# EAGLE board ecad-transmitter-v4-transmitter-v4-brd (EAGLE 9.7.0)
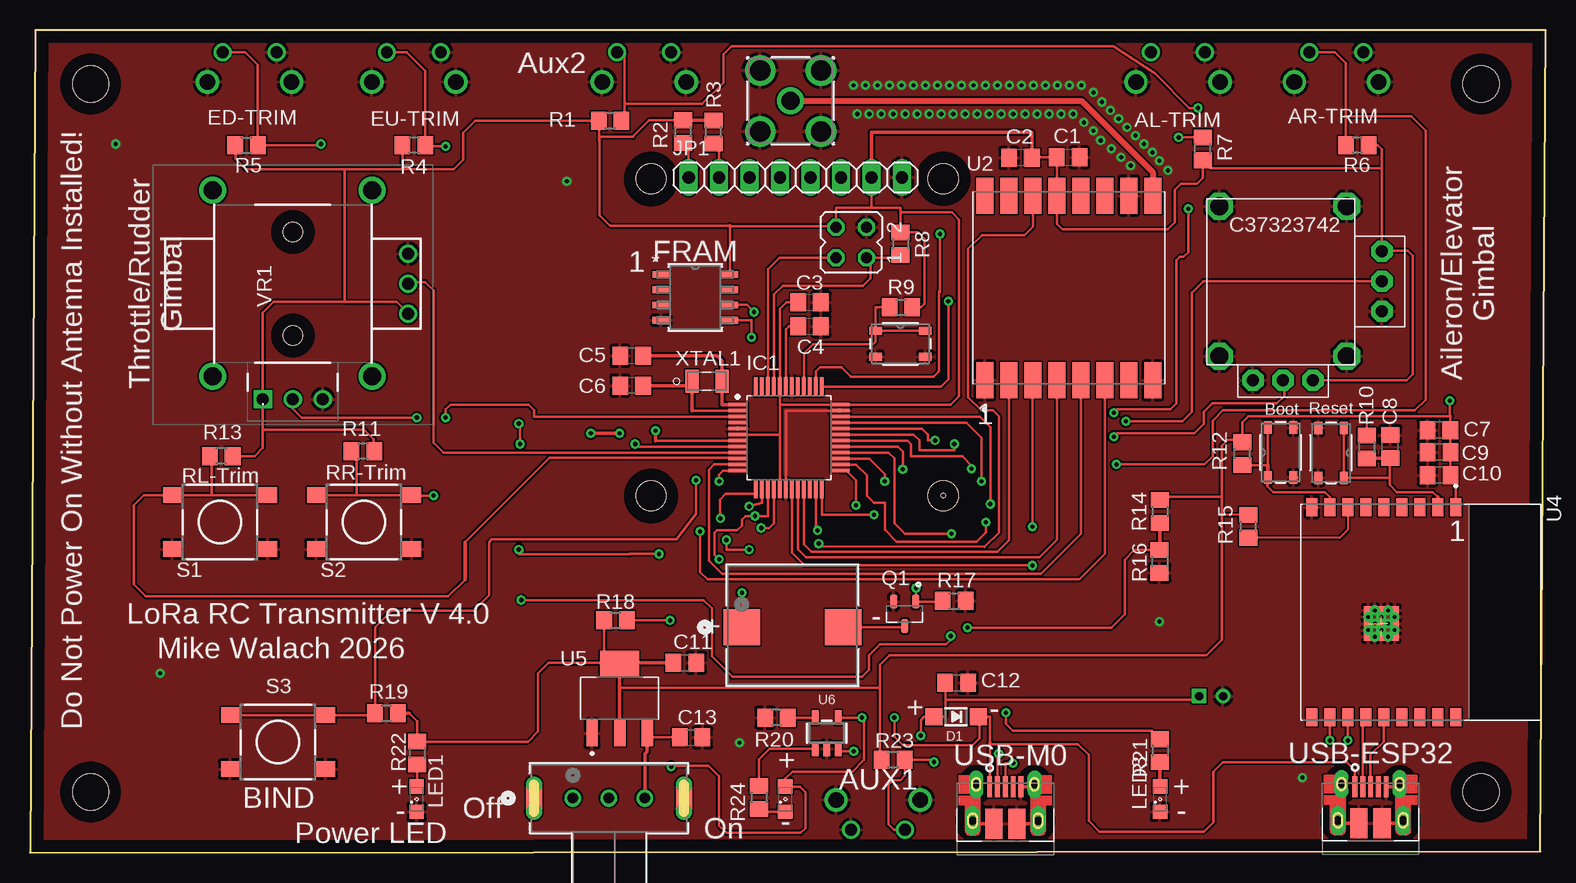
[diagram p0: board, top side]
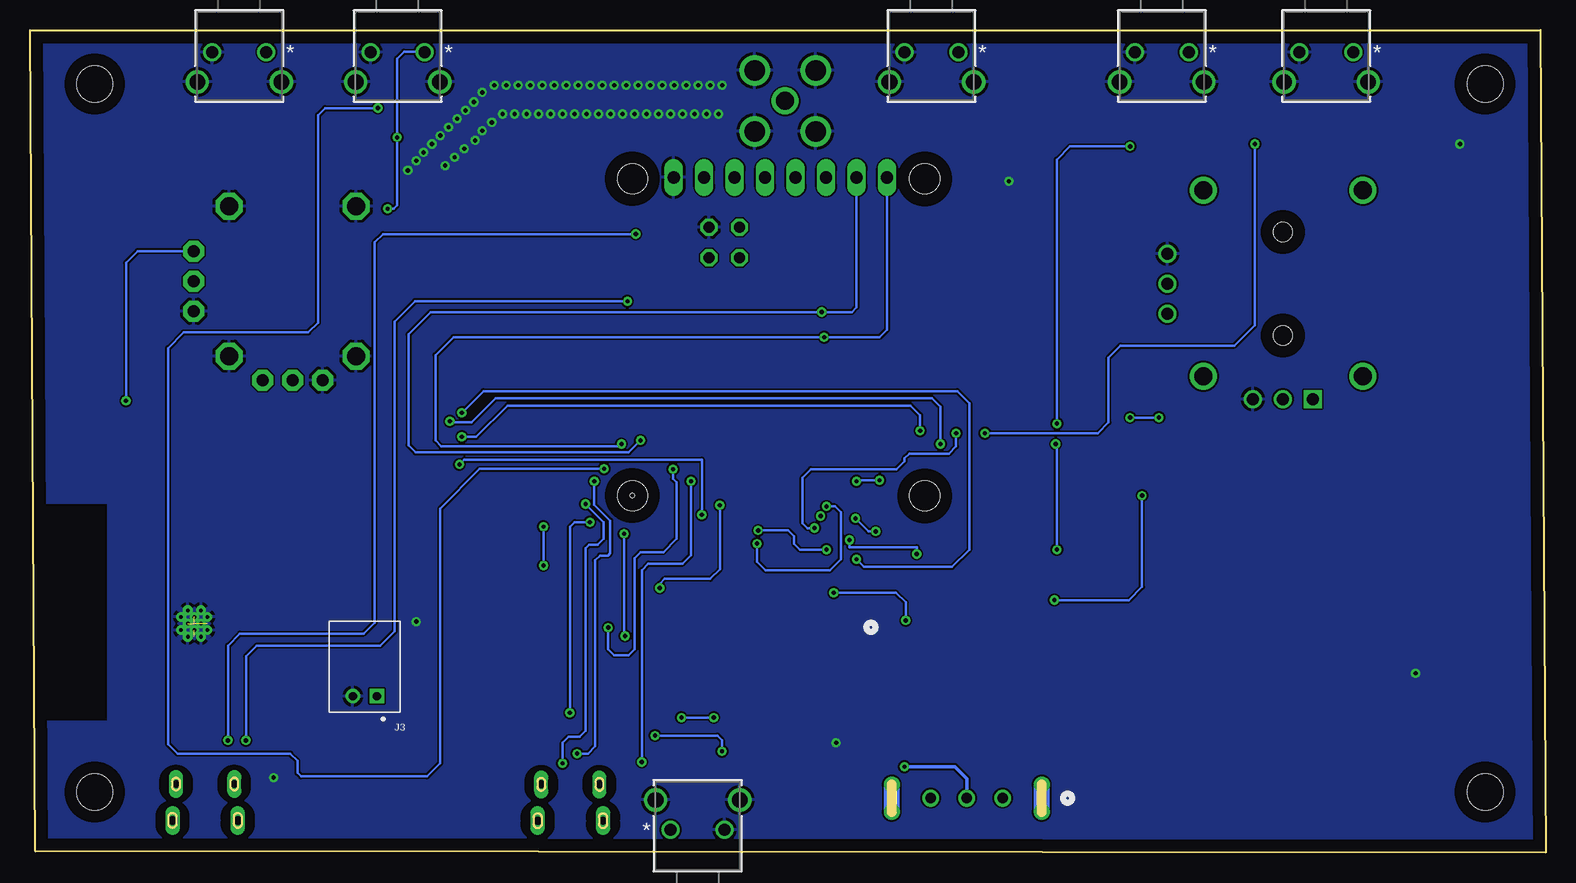
[diagram p1: board, bottom side, seen from below]

Size 126.35 x 68.55 mm. Coordinates in mm from the lower left corner, seen from the top.
Outline: 0.45,68.55 0,0 125.9,0.1 126.35,68.55 0.45,68.55
Outline: 78.74,6.18 78.77,6.19 78.8,6.2 78.83,6.21 78.85,6.21 78.88,6.21 78.91,6.21 78.94,6.21 78.97,6.2 78.99,6.19 79.02,6.18 79.04,6.17 79.07,6.15 79.09,6.14 79.11,6.12 79.13,6.1 79.15,6.08 79.16,6.05 79.18,6.03 79.19,6 79.2,5.97 79.2,5.95 79.2,5.92 79.21,5.89 79.21,5.49 79.2,5.46 79.2,5.43 79.2,5.4 79.19,5.38 79.18,5.35 79.16,5.33 79.15,5.3 79.13,5.28 79.11,5.26 79.09,5.24 79.07,5.22 79.04,5.21 79.02,5.19 78.99,5.18 78.97,5.17 78.94,5.17 78.91,5.16 78.88,5.16 78.85,5.16 78.83,5.17 78.8,5.17 78.77,5.18 78.74,5.19 78.72,5.21 78.7,5.22 78.67,5.24 78.65,5.26 78.63,5.28 78.62,5.3 78.6,5.33 78.59,5.35 78.58,5.38 78.57,5.4 78.56,5.43 78.56,5.46 78.56,5.49 78.56,5.89 78.56,5.92 78.56,5.95 78.57,5.97 78.58,6 78.59,6.03 78.6,6.05 78.62,6.08 78.63,6.1 78.65,6.12 78.67,6.14 78.7,6.15 78.72,6.17 78.74,6.18
Outline: 109.01,6 109.02,6.02 109.03,6.05 109.04,6.08 109.06,6.1 109.08,6.12 109.1,6.14 109.12,6.16 109.14,6.18 109.16,6.19 109.19,6.21 109.21,6.22 109.24,6.23 109.27,6.23 109.3,6.24 109.33,6.24 109.35,6.24 109.38,6.23 109.41,6.23 109.44,6.22 109.46,6.21 109.49,6.19 109.51,6.18 109.53,6.16 109.55,6.14 109.57,6.12 109.59,6.1 109.61,6.08 109.62,6.05 109.63,6.02 109.64,6 109.64,5.97 109.65,5.94 109.65,5.91 109.65,5.51 109.65,5.48 109.64,5.46 109.64,5.43 109.63,5.4 109.62,5.38 109.61,5.35 109.59,5.33 109.57,5.3 109.55,5.28 109.53,5.26 109.51,5.25 109.49,5.23 109.46,5.22 109.44,5.21 109.41,5.2 109.38,5.19 109.35,5.19 109.33,5.19 109.3,5.19 109.27,5.19 109.24,5.2 109.21,5.21 109.19,5.22 109.16,5.23 109.14,5.25 109.12,5.26 109.1,5.28 109.08,5.3 109.06,5.33 109.04,5.35 109.03,5.38 109.02,5.4 109.01,5.43 109.01,5.46 109,5.48 109,5.51 109,5.91 109,5.94 109.01,5.97 109.01,6
Outline: 113.86,6 113.87,6.02 113.88,6.05 113.89,6.08 113.91,6.1 113.93,6.12 113.95,6.14 113.97,6.16 113.99,6.18 114.01,6.19 114.04,6.21 114.06,6.22 114.09,6.23 114.12,6.23 114.15,6.24 114.17,6.24 114.2,6.24 114.23,6.23 114.26,6.23 114.29,6.22 114.31,6.21 114.34,6.19 114.36,6.18 114.38,6.16 114.41,6.14 114.42,6.12 114.44,6.1 114.46,6.08 114.47,6.05 114.48,6.02 114.49,6 114.49,5.97 114.5,5.94 114.5,5.91 114.5,5.51 114.5,5.48 114.49,5.46 114.49,5.43 114.48,5.4 114.47,5.38 114.46,5.35 114.44,5.33 114.42,5.3 114.41,5.28 114.38,5.26 114.36,5.25 114.34,5.23 114.31,5.22 114.29,5.21 114.26,5.2 114.23,5.19 114.2,5.19 114.17,5.19 114.15,5.19 114.12,5.19 114.09,5.2 114.06,5.21 114.04,5.22 114.01,5.23 113.99,5.25 113.97,5.26 113.95,5.28 113.93,5.3 113.91,5.33 113.89,5.35 113.88,5.38 113.87,5.4 113.86,5.43 113.86,5.46 113.85,5.48 113.85,5.51 113.85,5.91 113.85,5.94 113.86,5.97 113.86,6
Outline: 114.73,2.18 114.71,2.16 114.68,2.14 114.66,2.13 114.63,2.11 114.61,2.1 114.58,2.09 114.55,2.09 114.52,2.08 114.49,2.08 114.45,2.08 114.43,2.08 114.4,2.09 114.37,2.09 114.34,2.1 114.32,2.11 114.29,2.13 114.27,2.14 114.24,2.16 114.22,2.18 114.2,2.2 114.19,2.22 114.17,2.25 114.16,2.27 114.14,2.3 114.14,2.33 114.13,2.36 114.13,2.38 114.13,2.41 114.13,2.95 114.13,2.98 114.13,3.01 114.14,3.04 114.14,3.07 114.16,3.09 114.17,3.12 114.19,3.14 114.2,3.16 114.22,3.19 114.24,3.21 114.27,3.22 114.29,3.24 114.32,3.25 114.34,3.26 114.37,3.27 114.4,3.28 114.43,3.28 114.45,3.28 114.49,3.28 114.52,3.28 114.55,3.28 114.58,3.27 114.61,3.26 114.63,3.25 114.66,3.24 114.68,3.22 114.71,3.21 114.73,3.19 114.75,3.16 114.77,3.14 114.78,3.12 114.79,3.09 114.8,3.07 114.81,3.04 114.82,3.01 114.82,2.98 114.83,2.95 114.83,2.41 114.82,2.38 114.82,2.36 114.81,2.33 114.8,2.3 114.79,2.27 114.78,2.25 114.77,2.22 114.75,2.2 114.73,2.18
Outline: 84.28,3.16 84.31,3.14 84.32,3.12 84.34,3.09 84.35,3.07 84.36,3.04 84.37,3.01 84.38,2.98 84.38,2.96 84.38,2.93 84.38,2.39 84.38,2.36 84.38,2.33 84.37,2.3 84.36,2.28 84.35,2.25 84.34,2.22 84.32,2.2 84.31,2.18 84.28,2.16 84.26,2.14 84.24,2.12 84.22,2.1 84.19,2.09 84.17,2.08 84.14,2.07 84.11,2.06 84.08,2.06 84.05,2.06 84.01,2.06 83.98,2.06 83.95,2.06 83.93,2.07 83.9,2.08 83.87,2.09 83.85,2.1 83.82,2.12 83.8,2.14 83.78,2.16 83.76,2.18 83.74,2.2 83.73,2.22 83.71,2.25 83.7,2.28 83.69,2.3 83.69,2.33 83.68,2.36 83.68,2.39 83.68,2.93 83.68,2.96 83.69,2.98 83.69,3.01 83.7,3.04 83.71,3.07 83.73,3.09 83.74,3.12 83.76,3.14 83.78,3.16 83.8,3.18 83.82,3.2 83.85,3.21 83.87,3.23 83.9,3.24 83.93,3.25 83.95,3.25 83.98,3.26 84.01,3.26 84.05,3.26 84.08,3.26 84.11,3.25 84.14,3.25 84.17,3.24 84.19,3.23 84.22,3.21 84.24,3.2 84.26,3.18 84.28,3.16
Outline: 78.84,3.16 78.86,3.14 78.87,3.12 78.89,3.09 78.9,3.07 78.91,3.04 78.92,3.01 78.93,2.98 78.93,2.96 78.93,2.93 78.93,2.39 78.93,2.36 78.93,2.33 78.92,2.3 78.91,2.28 78.9,2.25 78.89,2.22 78.87,2.2 78.86,2.18 78.84,2.16 78.81,2.14 78.79,2.12 78.77,2.1 78.74,2.09 78.72,2.08 78.69,2.07 78.66,2.06 78.63,2.06 78.6,2.06 78.56,2.06 78.53,2.06 78.5,2.06 78.48,2.07 78.45,2.08 78.42,2.09 78.4,2.1 78.37,2.12 78.35,2.14 78.33,2.16 78.31,2.18 78.29,2.2 78.28,2.22 78.26,2.25 78.25,2.28 78.24,2.3 78.24,2.33 78.23,2.36 78.23,2.39 78.23,2.93 78.23,2.96 78.24,2.98 78.24,3.01 78.25,3.04 78.26,3.07 78.28,3.09 78.29,3.12 78.31,3.14 78.33,3.16 78.35,3.18 78.37,3.2 78.4,3.21 78.42,3.23 78.45,3.24 78.48,3.25 78.5,3.25 78.53,3.26 78.56,3.26 78.6,3.26 78.63,3.26 78.66,3.25 78.69,3.25 78.72,3.24 78.74,3.23 78.77,3.21 78.79,3.2 78.81,3.18 78.84,3.16
Outline: 109.28,2.18 109.26,2.16 109.23,2.14 109.21,2.13 109.18,2.11 109.16,2.1 109.13,2.09 109.1,2.09 109.07,2.08 109.05,2.08 109.01,2.08 108.98,2.08 108.95,2.09 108.92,2.09 108.89,2.1 108.86,2.11 108.84,2.13 108.82,2.14 108.79,2.16 108.77,2.18 108.75,2.2 108.73,2.22 108.72,2.25 108.71,2.27 108.7,2.3 108.69,2.33 108.68,2.36 108.68,2.38 108.67,2.41 108.67,2.95 108.68,2.98 108.68,3.01 108.69,3.04 108.7,3.07 108.71,3.09 108.72,3.12 108.73,3.14 108.75,3.16 108.77,3.19 108.79,3.21 108.82,3.22 108.84,3.24 108.86,3.25 108.89,3.26 108.92,3.27 108.95,3.28 108.98,3.28 109.01,3.28 109.05,3.28 109.07,3.28 109.1,3.28 109.13,3.27 109.16,3.26 109.18,3.25 109.21,3.24 109.23,3.22 109.26,3.21 109.28,3.19 109.3,3.16 109.32,3.14 109.33,3.12 109.34,3.09 109.36,3.07 109.36,3.04 109.37,3.01 109.37,2.98 109.38,2.95 109.38,2.41 109.37,2.38 109.37,2.36 109.36,2.33 109.36,2.3 109.34,2.27 109.33,2.25 109.32,2.22 109.3,2.2 109.28,2.18
Outline: 83.59,6.18 83.62,6.19 83.65,6.2 83.67,6.21 83.7,6.21 83.73,6.21 83.76,6.21 83.79,6.21 83.82,6.2 83.84,6.19 83.87,6.18 83.89,6.17 83.92,6.15 83.94,6.14 83.96,6.12 83.98,6.1 84,6.08 84.01,6.05 84.03,6.03 84.04,6 84.05,5.97 84.05,5.95 84.06,5.92 84.06,5.89 84.06,5.49 84.06,5.46 84.05,5.43 84.05,5.4 84.04,5.38 84.03,5.35 84.01,5.33 84,5.3 83.98,5.28 83.96,5.26 83.94,5.24 83.92,5.22 83.89,5.21 83.87,5.19 83.84,5.18 83.82,5.17 83.79,5.17 83.76,5.16 83.73,5.16 83.7,5.16 83.67,5.17 83.65,5.17 83.62,5.18 83.59,5.19 83.57,5.21 83.55,5.22 83.52,5.24 83.5,5.26 83.48,5.28 83.47,5.3 83.45,5.33 83.44,5.35 83.43,5.38 83.42,5.4 83.41,5.43 83.41,5.46 83.41,5.49 83.41,5.89 83.41,5.92 83.41,5.95 83.42,5.97 83.43,6 83.44,6.03 83.45,6.05 83.47,6.08 83.48,6.1 83.5,6.12 83.52,6.14 83.55,6.15 83.57,6.17 83.59,6.18
Copper layers (1*16): Top 0.035mm / dielectric 1.5mm / Bottom 0.035mm
Design rules "Fusion Electronics Design Rules": minimum track width 6mil, minimum drill 0.35mm, track to track 6mil, track to pad 6mil, pad to pad 6mil, via to via 6mil, smd to smd 6mil, copper to edge 40mil, drill to drill 6mil, minimum pad ring 10mil, minimum via ring 8mil, stop-mask expansion 4mil, vias tented up to drill 9999mil, thermal gap 10mil
Holes 3 mm at 5.05,64.05 120.95,64.05 5.05,5.05 120.95,5.05
Holes 2.5 mm at 51.77,56.15 51.77,29.73 76.13,56.16 76.13,29.74
Holes 0.35 mm at 76.13,29.74

## Footprints (pad centres in the part's own frame; a part is rotated, then mirrored left to right if it is on the bottom)
C0805 = smd 1.3 x 1.5: 1 -0.95,0; 2 0.95,0
MICROBUILDER_SOD-123 = smd 1.4 x 1.4: A 1.85,0; C -1.85,0
C37323742 = drill 1.5 pad 2.184 octagon: G1 -5.3,6.25; G2 5.3,6.25; G3 -5.3,-6.25; G4 5.3,-6.25 | drill 1 pad 1.778 octagon: P1 -2.5,-8.25; P2 0,-8.25; P3 2.5,-8.25; P4 8.25,-2.5; P5 8.25,0; P6 8.25,2.5
QFP50P900X900X120-48 = smd 1.6 x 0.3: 1 -4.25,2.75; 2 -4.25,2.25; 3 -4.25,1.75; 4 -4.25,1.25; 5 -4.25,0.75; 6 -4.25,0.25; 7 -4.25,-0.25; 8 -4.25,-0.75; 9 -4.25,-1.25; 10 -4.25,-1.75; 11 -4.25,-2.25; 12 -4.25,-2.75; 25 4.25,-2.75; 26 4.25,-2.25; 27 4.25,-1.75; 28 4.25,-1.25; 29 4.25,-0.75; 30 4.25,-0.25; 31 4.25,0.25; 32 4.25,0.75; 33 4.25,1.25; 34 4.25,1.75; 35 4.25,2.25; 36 4.25,2.75 | smd 0.3 x 1.6: 13 -2.75,-4.25; 14 -2.25,-4.25; 15 -1.75,-4.25; 16 -1.25,-4.25; 17 -0.75,-4.25; 18 -0.25,-4.25; 19 0.25,-4.25; 20 0.75,-4.25; 21 1.25,-4.25; 22 1.75,-4.25; 23 2.25,-4.25; 24 2.75,-4.25; 37 2.75,4.25; 38 2.25,4.25; 39 1.75,4.25; 40 1.25,4.25; 41 0.75,4.25; 42 0.25,4.25; 43 -0.25,4.25; 44 -0.75,4.25; 45 -1.25,4.25; 46 -1.75,4.25; 47 -2.25,4.25; 48 -2.75,4.25
10103594 = smd 0.4 x 1.75: 1 -1.3,2.825; 2 -0.65,2.825; 3 0,2.825; 4 0.65,2.825; 5 1.3,2.825 | smd 1.425 x 2.5: 6 -0.963,-0.25; 7 0.963,-0.25 | drill 0.65 pad 0.73 long: SH1 -2.425,3.03; SH2 2.425,3.03 | drill 0.7 long: SH3 -2.725,0; SH4 2.725,0
S2B-PH-K-S(LF)(SN) = drill 0.7 square: 1 -1,0 | drill 0.7: 2 1,0
1X08 = drill 1.016 long: 1 -8.89,0; 2 -6.35,0; 3 -3.81,0; 4 -1.27,0; 5 1.27,0; 6 3.81,0; 7 6.35,0; 8 8.89,0
JP2Q = drill 0.914 octagon: 1 -1.27,-1.27; 2 -1.27,1.27; 3 1.27,-1.27; 4 1.27,1.27
SML0805 = smd 1.2 x 1.2: A 1.05,0; C -1.05,0
SMTB-0927-TW-R_PUI = smd 3.048 x 2.997: 1 -4.225,-0.172; 2 4.225,-0.172
SOT91P240X110-3N = smd 1.18 x 0.61: 1 -1.025,0.915; 2 -1.025,-0.915; 3 1.025,0
R0805 = smd 1.3 x 1.5: 1 -0.95,0; 2 0.95,0
DTSM-6 = smd 1.55 x 1.3: 1 -3.975,2.25; 2 3.975,2.25; 3 -3.975,-2.25; 4 3.975,-2.25
PTS810 = smd 1.041 x 0.66: 1 -2.075,1.075; 2 2.075,1.075; 3 -2.075,-1.075; 4 2.075,-1.075
SW2_1825027-C_TEC = drill 0.991 pad 1.499: 1 0,0; 2 4.5,0 | drill 1.295 pad 1.803: 3 -1.255,2.49; 4 5.755,2.49
EG1206A_EWI = drill 0.889 pad 1.397: 1 0,0; 2 3,0; 3 6,0 | smd 1.321 x 3.607: 4 -3.25,0; 5 9.25,0 | drill 0.813 pad 1.321: S_1_H1 -3.25,1.143; S_1_H2 -3.25,-1.143; S_2_H1 9.25,1.143; S_2_H2 9.25,-1.143
132134_AMP = drill 1.499 pad 2.007: 1 0,0 | drill 1.702 pad 2.21: 2 -2.54,2.54; 3 -2.54,-2.54; 4 2.54,-2.54; 5 2.54,2.54
XCVR_RFM95W-915S2 = smd 3 x 1.4: 1 -7.7,7; 2 -7.7,5; 3 -7.7,3; 4 -7.7,1; 5 -7.7,-1; 6 -7.7,-3; 7 -7.7,-5; 8 -7.7,-7; 9 7.7,-7; 10 7.7,-5; 11 7.7,-3; 12 7.7,-1; 13 7.7,1; 14 7.7,3; 15 7.7,5; 16 7.7,7
FPT-8P-M02_FUJ = smd 1.448 x 0.559: 1 -2.832,1.905; 2 -2.832,0.635; 3 -2.832,-0.635; 4 -2.832,-1.905; 5 2.832,-1.905; 6 2.832,-0.635; 7 2.832,0.635; 8 2.832,1.905
MODULE_ESP32-C3-WROOM-02-H4 = smd 1.5 x 0.9: 1 -8.75,2.9; 2 -8.75,1.4; 3 -8.75,-0.1; 4 -8.75,-1.6; 5 -8.75,-3.1; 6 -8.75,-4.6; 7 -8.75,-6.1; 8 -8.75,-7.6; 9 -8.75,-9.1; 10 8.75,-9.1; 11 8.75,-7.6; 12 8.75,-6.1; 13 8.75,-4.6; 14 8.75,-3.1; 15 8.75,-1.6; 16 8.75,-0.1; 17 8.75,1.4; 18 8.75,2.9 | smd 0.7 x 0.7: 19 -0.14,-2.2; 20 0.96,-2.2; 21 2.06,-2.2; 22 -0.14,-3.3; 23 0.96,-3.3; 24 2.06,-3.3; 25 -0.14,-4.4; 26 0.96,-4.4; 27 2.06,-4.4 | drill 0.3 pad 0.4: 28 0.41,-2.2; 29 1.51,-2.2; 30 -0.14,-2.75; 31 0.96,-2.75; 32 2.06,-2.75; 33 0.41,-3.3; 34 1.51,-3.3; 35 -0.14,-3.85; 36 0.96,-3.85; 37 2.06,-3.85; 38 0.41,-4.4; 39 1.51,-4.4
VREG_TLV1117LV33DCYR = smd 2.15 x 0.95: 1 -2.9,2.3; 2 -2.9,0; 3 -2.9,-2.3 | smd 2.15 x 3.25: 4 2.9,0
MICROBUILDER_SOT23-5 = smd 0.55 x 1.2: 1 -0.95,-1.3; 2 0,-1.3; 3 0.95,-1.3; 4 0.95,1.3; 5 -0.95,1.3
RKJXV1224005 = drill 1.5 pad 2.25: 1 -1.023,9.123; 2 -16.523,9.123; 3 -16.523,-4.177; 4 -1.023,-4.177 | drill 1 pad 1.5 square: A1 0.877,0 | drill 1 pad 1.5: A2 0.877,2.5; A3 0.877,5; B1 -6.23,12.123; B2 -8.73,12.123; B3 -11.23,12.123 | hole 1.6: -4.43,2.5; -13.03,2.5
XTAL_ABS07-32.768KHZ-T = smd 1.1 x 1.9: 1 -1.25,0; 2 1.25,0

## Placement (x,y rotation side)
C1  10uF  [C0805]  86.54,57.93 0 top
C2  0.1uF  [C0805]  82.57,57.9 180 top
C3  1uF  [C0805]  64.98,45.86 0 top
C4  1uF  [C0805]  64.98,43.87 0 top
C5  22pF  [C0805]  50.15,41.39 180 top
C6  22pF  [C0805]  50.15,38.92 180 top
C7  10uF  [C0805]  117.45,35.2 180 top
C8  1uF  [C0805]  113.4,33.85 90 top
C9  1uF  [C0805]  117.45,33.35 180 top
C10  0.1uF  [C0805]  117.45,31.45 180 top
C11  1uF  [C0805]  54.59,15.83 0 top
C12  10uF  [C0805]  77.25,14.15 0 top
C13  1uF  [C0805]  55.1,9.59 0 top
D1  [MICROBUILDER_SOD-123]  77.2,11.33 180 top
G1  C37323742  [C37323742]  104.45,47.61 0 top
IC1  ATSAMD21G  [QFP50P900X900X120-48]  63.26,34.58 0 top
J1  10103594  [10103594]  111.75,2.68 0 top
J2  10103594  [10103594]  81.31,2.66 0 top
J3  S2B-PH-K-S(LF)(SN)  [S2B-PH-K-S(LF)(SN)]  98.45,13.03 180 bottom
JP1  PINHD-1X8  [1X08]  63.8,56.26 0 top
JP2  [JP2Q]  68.46,50.85 90 top
LED1  [SML0805]  32.23,4.45 90 top
LED2  [SML0805]  62.95,4.45 90 top
LED3  [SML0805]  94.2,4.45 90 top
LS1  SMTB-0927-TW-RSMTB-0927-TW-R_PUI  [SMTB-0927-TW-R_PUI]  63.55,18.95 0 top
Q1  2N7002K-7  [SOT91P240X110-3N]  72.91,19.89 270 top
R1  1K  [R0805]  48.35,61.01 0 top
R2  10K  [R0805]  54.42,60.08 270 top
R3  10K  [R0805]  56.98,60.05 90 top
R4  1K  [R0805]  31.99,58.95 180 top
R5  1K  [R0805]  18.05,58.95 0 top
R6  1K  [R0805]  110.65,58.95 180 top
R7  1K  [R0805]  97.75,58.65 90 top
R8  1K  [R0805]  72.56,50.73 270 top
R9  1K  [R0805]  72.6,45.44 0 top
R10  10k  [R0805]  111.45,33.8 90 top
R11  1K  [R0805]  27.75,33.45 180 top
R12  10k  [R0805]  101.05,33.25 90 top
R13  1K  [R0805]  15.95,33.05 180 top
R14  10K  [R0805]  94.19,28.43 270 top
R15  10k  [R0805]  101.56,27.19 90 top
R16  10K  [R0805]  94.16,24.27 270 top
R17  100k  [R0805]  77.03,20.98 0 top
R18  0-100  [R0805]  48.81,19.36 0 top
R19  1K  [R0805]  29.71,11.6 180 top
R20  10K  [R0805]  62.23,11.26 180 top
R21  2.2K  [R0805]  94.21,8.5 270 top
R22  2.2K  [R0805]  32.27,8.3 270 top
R23  1K  [R0805]  71.95,7.75 0 top
R24  1K  [R0805]  60.78,4.6 270 top
S1  DTSM-6  [DTSM-6]  15.84,27.55 0 top
S2  DTSM-6  [DTSM-6]  27.84,27.55 0 top
S3  DTSM-6  [DTSM-6]  20.67,9.2 0 top
SW1  PTS810SJG250SMTRLFSPTS810  [PTS810]  72.56,42.4 0 top
SW2  PTS810SJG250SMTRLFSPTS810  [PTS810]  104.25,33.35 90 top
SW3  PTS810SJG250SMTRLFSPTS810  [PTS810]  108.45,33.31 270 top
SW5  1825027-8SW2_1825027-C_TEC  [SW2_1825027-C_TEC]  16.05,66.71 180 bottom
SW6  1825027-8SW2_1825027-C_TEC  [SW2_1825027-C_TEC]  29.75,66.71 180 bottom
SW7  1825027-8SW2_1825027-C_TEC  [SW2_1825027-C_TEC]  48.95,66.71 180 bottom
SW8  1825027-8SW2_1825027-C_TEC  [SW2_1825027-C_TEC]  93.45,66.71 180 bottom
SW9  1825027-8SW2_1825027-C_TEC  [SW2_1825027-C_TEC]  106.65,66.71 180 bottom
SW10  1825027-8SW2_1825027-C_TEC  [SW2_1825027-C_TEC]  72.95,1.9 0 bottom
SW11  EG1206AEG1206A_EWI  [EG1206A_EWI]  45.26,4.54 0 top
U1  132134132134_AMP  [132134_AMP]  63.4,62.64 0 top
U2  RFM95W-915S2  [XCVR_RFM95W-915S2]  86.6,47.06 90 top
U3  MB85RC256VPNF-G-JNERE1FPT-8P-M02_FUJ  [FPT-8P-M02_FUJ]  55.45,46.27 0 top
U4  ESP32-C3-WROOM-02-H4  [MODULE_ESP32-C3-WROOM-02-H4]  115.95,20.05 270 top
U5  TLV1117LV33DCYR  [VREG_TLV1117LV33DCYR]  49.15,12.85 90 top
U6  [MICROBUILDER_SOT23-5]  66.42,9.95 0 top
VR1  RKJXV1224005  [RKJXV1224005]  19.41,38.67 270 top
XTAL1  32.768kHz  [XTAL_ABS07-32.768KHZ-T]  56.43,39.27 0 top

## Library data of the parts
C1-C13 = rcl; SPICEPREFIX: C
D1 U6 = flightcomputer-2023
G1 = C37323742
IC1 = IC_Embedded; CATEGORY: IC_Embedded; CORE: ARM Cortex M0+; DESCRIPTION: Low-power, high-performance Microchip's ARM® Cortex®-M0+ based flash microcontroller; MANUFACTURER: Microchip Technology; MPN: ATSAMD21G; OPERATING_TEMP: variable; PACKAGE: TQFP-48; PART_STATUS: Active; ROHS_COMPLIANT: COMPLIANT; SERIES: SAM D21G; SUB-CATEGORY: Microcontroller; TYPE: 32 bit Microcontroller
J1 J2 = Connector_USB; CATEGORY: Connectors; CONTACTS: 5; CURRENT-RATING: 1.8A; DESCRIPTION: CONN RCPT USB2.0 MICRO B SMD R/A; GENDER: Receptacle; MANUFACTURER: Amphenol ICC (FCI); MOUNT_TYPE: R/A; MPN: 10103594-0001LF; OPERATING_TEMPERATURE: -30°C ~ 80°C; PART_STATUS: ACTIVE; ROHS_COMPLIANT: COMPLIANT; SUB_CATEGORY: USB; TYPE: USB-micro B; VOLTAGE-RATING: 100VAC
J3 = Connectors; CREATED_BY: PCBLayout.com; DIGI_KEY_PART_NUMBER: 455-1719-ND; MANUFACTURER: JST Sales America Inc.; MPN: S2B-PH-K-S(LF)(SN)
JP1 = Connector; CATEGORY: Headers; DESCRIPTION: Header, Straight, 8 Position; MANUFACTURER: Generic; MPN: Generic; OPERATING_TEMPERATURE: Generic; PART_STATUS: Active; PITCH: 0.100" (2.54mm); ROHS_COMPLIANCE: Generic; SERIES: Generic; SUB-CATEGORY: Headers, Male Pins; TYPE: Board to Board or Cable, Unshrouded, Through Hole, Straight
JP2 = jumper
LED1-LED3 = led
LS1 = 2026-06-20_23-40-30_Library; COPYRIGHT: Copyright (C) 2026 Ultra Librarian. All rights reserved.; MANUFACTURER_NAME: PUI Audio; MANUFACTURER_PART_NUMBER: SMTB-0927-TW-R
Q1 = 2N7002K-7; MANUFACTURER: Diodes Inc.; MAXIMUM_PACKAGE_HIEGHT: 1.1mm; PARTREV: 15-2; STANDARD: IPC7351B
R1-R24 = rcl; SPICEPREFIX: R
S1-S3 = switch-tact
SW1-SW3 = 2024-06-17_17-27-14_Library; COPYRIGHT: Copyright (C) 2024 Ultra Librarian. All rights reserved.; MANUFACTURER_PART_NUMBER: PTS810SJG250SMTRLFS; MFR_NAME: C&K Components
SW5-SW10 = 1825027-8; COPYRIGHT: Copyright (C) 2026 Ultra Librarian. All rights reserved.; DESCRIPTION: FSMRA3JH04=R/A,TACT PB SW,160G; MANUFACTURER_NAME: TE Connectivity; MANUFACTURER_PART_NUMBER: 1825027-8
SW11 = EG1206A-plated-slots; COPYRIGHT: Copyright (C) 2026 Ultra Librarian. All rights reserved.; MANUFACTURER_NAME: E-Switch; MANUFACTURER_PART_NUMBER: EG1206A
U1 = 2025-03-19_02-22-58_Library; COPYRIGHT: Copyright (C) 2025 Ultra Librarian. All rights reserved.; MANUFACTURER_PART_NUMBER: 132134; MFR_NAME: Amphenol ICC
U2 = RFM95W-915S2; AVAILABILITY: In Stock; CHECK_PRICES: https://www.snapeda.com/parts/RFM95W-915S2/RF/view-part/?ref=eda; DESCRIPTION: 802.15.4 LoRa™ Transceiver Module 915MHz Antenna Not Included Surface Mount; MF: RF Solutions; MP: RFM95W-915S2; PACKAGE: Non Standard RF Solutions; PRICE: None; PURCHASE-URL: https://www.snapeda.com/api/url_track_click_mouser/?unipart_id=585488&manufacturer=RF Solutions&part_name=RFM95W-915S2&search_term=None; SNAPEDA_LINK: https://www.snapeda.com/parts/RFM95W-915S2/RF/view-part/?ref=snap
U3 = 2025-09-02_13-41-18_Library; COPYRIGHT: Copyright (C) 2025 Ultra Librarian. All rights reserved.; MANUFACTURER_NAME: Fujitsu Semiconductor; MANUFACTURER_PART_NUMBER: MB85RC256VPNF-G-JNERE1
U4 = ESP32-C3-WROOM-02-H4; AVAILABILITY: In Stock; DESCRIPTION: WiFi Modules (802.11) (Engineering Samples) SMD module, ESP32-C3, 4MB SPI flash, PCB antenna, -40 C +105 C; MF: Espressif Systems; MP: ESP32-C3-WROOM-02-H4; PACKAGE: Package; PRICE: None; PURCHASE-URL: https://pricing.snapeda.com/search/part/ESP32-C3-WROOM-02-H4/?ref=eda
U5 = TLV1117LV33DCYR; MANUFACTURER: Texas Instruments; MAXIMUM_PACKAGE_HEIGHT: 1.80 mm; PARTREV: B; STANDARD: IPC-7351B
VR1 = RKJXV1224005; DESCRIPTION: Plugin,13x13mm Multi-Directional Switches ROHS, Rotary Potentiometer, 10 kOhm, 1Turn, 12.5 mW; HEIGHT: 18.95mm; MANUFACTURER_NAME: ALPS Electric; MANUFACTURER_PART_NUMBER: RKJXV1224005; MOUSER_PART_NUMBER: 688-RKJXV1224005; MOUSER_PRICE-STOCK: https://www.mouser.co.uk/ProductDetail/Alps-Alpine/RKJXV1224005?qs=RiQAlOPxzzAqLSX9lUzx8Q%3D%3D
XTAL1 = Crystal-WA; CATEGORY: Crystal; MANUFACTURER: Abracon LLC; MPN: ABS07-32.768KHZ-T; OPERATING_TEMPERATURE: -40°C ~ 85°C; PART_STATUS: ACTIVE; ROHS_COMPLIANT: COMPLIANT; SERIES: ABS07; SUB_CATEGORY: Crystal Surface Mount; TYPE: Crystal

## Nets
+3V3: C1.1 C2.1 C3.1 C7.1 C9.1 C10.1 C11.1 G1.P3 G1.P6 IC1.6 IC1.17 IC1.36 IC1.44 JP1.7 JP2.4 R1.1 R2.1 R3.2 R4.2 R5.1 R6.1 R7.1 R8.1 R9.2 R10.2 R11.1 R12.2 R13.1 R14.1 R15.2 R18.1 R19.1 R22.1 R23.1 U2.13 U3.8 U4.1 U5.2 U5.4 VR1.A1 VR1.B1
A0: IC1.3 VR1.A2
A1: G1.P2 IC1.7
A2: G1.P5 IC1.8
A3: IC1.9 VR1.B2
A4: IC1.10 R13.2 S1.1 S1.2
AREF: IC1.4
BOOT: R12.1 SW2.1 SW2.2 U4.8
D0: IC1.16 R5.2 SW5.1
D1: IC1.15 R7.2 SW8.1
D2: IC1.23 R4.1 SW6.1
D5: IC1.24 R6.2 SW9.1
D6: IC1.29 R14.2 R16.1
D7: IC1.30 R1.2 SW7.1
D9: IC1.12 R19.2 S3.1 S3.2
D10: IC1.27 R23.2 SW10.1
D11: IC1.25 Q1.1 R17.1
D12: IC1.28 R11.2 S2.1 S2.2
D13: IC1.26 R21.1
D+: IC1.34 J2.3
D+_ESP: J1.3 U4.14
D-: IC1.33 J2.2
D-_ESP: J1.2 U4.13
DIO0: IC1.14 U2.14
DIO1: U2.15
DIO2: U2.16
DIO3: U2.11
DIO4: U2.12
DIO5: U2.7
GND: C1.2 C2.2 C3.2 C4.2 C5.2 C6.2 C7.2 C8.2 C9.2 C10.2 C11.2 C12.2 C13.2 G1.G1 G1.G2 G1.G3 G1.G4 G1.P1 G1.P4 IC1.5 IC1.18 IC1.35 IC1.42 J1.5 J1.6 J1.7 J1.SH1 J1.SH2 J1.SH3 J1.SH4 J2.5 J2.6 J2.7 J2.SH1 J2.SH2 J2.SH3 J2.SH4 J3.2 JP1.8 JP2.3 LED1.C LED3.C Q1.2 R16.2 R17.2 R20.2 S1.3 S1.4 S2.3 S2.4 S3.3 S3.4 SW1.3 SW1.4 SW2.3 SW2.4 SW3.3 SW3.4 SW5.2 SW5.3 SW5.4 SW6.2 SW6.3 SW6.4 SW7.2 SW7.3 SW7.4 SW8.2 SW8.3 SW8.4 SW9.2 SW9.3 SW9.4 SW10.2 SW10.3 SW10.4 U1.2 U1.3 U1.4 U1.5 U2.1 U2.8 U2.10 U3.4 U4.9 U4.19 U4.20 U4.21 U4.22 U4.23 U4.24 U4.25 U4.26 U4.27 U4.28 U4.29 U4.30 U4.31 U4.32 U4.33 U4.34 U4.35 U4.36 U4.37 U4.38 U4.39 U5.1 U6.2 VR1.A3 VR1.B3
LORA_ANT: U1.1 U2.9
LORA_RESET: IC1.13 U2.6
MISO: IC1.21 U2.2
MOSI: IC1.19 U2.3
N$1: IC1.47
N$2: C4.1 IC1.43
N$3: IC1.41
N$4: LS1.1 R18.2
N$5: R24.1 U6.1
N$6: LS1.2 Q1.3
N$7: LED2.C R24.2
N$8: LED3.A R21.2
N$9: U3.7
N$10: R20.1 U6.5
N$11: U3.3
N$12: C6.1 IC1.2 XTAL1.1
N$13: U3.2
N$14: U3.1
N$15: C5.1 IC1.1 XTAL1.2
N$16: C13.1 SW11.3 U5.3
N$17: R15.1 U4.7
N$30: LED1.A R22.2
NSS: IC1.11 U2.5
RESET: IC1.40 R9.1 SW1.1 SW1.2
RESET_ESP: C8.1 R10.1 SW3.1 SW3.2 U4.2
RXD: IC1.38 U4.12
RXLED: IC1.48
SCK: IC1.20 U2.4
SCL: IC1.32 JP1.2 R3.1 U3.6
SDA: IC1.31 JP1.1 R2.2 U3.5
SWCLK: IC1.45 JP2.1 R8.2
SWDIO: IC1.46 JP2.2
TXD: IC1.37 U4.11
TXLED: IC1.39
VBAT: C12.1 D1.A J3.1 U6.3
VBUS: D1.C J1.1 J2.1 LED2.A SW11.2 U6.4

## Tracks (layer width: path | path; a pad name or v marks a point on that pad's centre or on a via)
+3V3  (via drill 0.35)
  Top 0.152: R15.2 99.35,28.14 99.35,28.12
  Top 0.2: 85.59,54.76 C1.1 83.52,57.93 | 62.51,34.83 IC1.17 | 62.51,34.83 IC1.6 | 62.51,37.33 IC1.36 76.73,37.33 77.45,38.05 77.45,52.75 76.85,53.35 72.56,53.35 | 62.51,37.33 62.51,34.83 | 62.51,37.33 IC1.44 62.51,45.31 63.06,45.86 C3.1 | 70.85,7.75 70.85,13.75 | 49.15,13.75 70.85,13.75 | 19.41,35.25 VR1.A1 19.41,44.97 20.33,45.89 26.25,45.89 | 19.41,35.25 19.41,33.75 18.71,33.05 R13.1 | 31.62,11.6 32.27,10.95 R22.1 41.5,9.25 42.35,10.1 42.35,14.94 43.24,15.83 47.86,15.83 | VR1.B1 30.55,45.89 26.25,45.89 | R6.1 112.35,58.95 112.7,58.6 112.7,57.05 | 112.7,57.05 G1.P6 | G1.P3 114.76,39.36 115.25,39.85 115.25,49.75 114.85,50.15 112.7,50.15 | U4.1 118.85,31.45 | C10.1 C9.1 C7.1 118.4,36.35 | R5.1 17.13,58.92 17.13,57.82 18,56.95 26.25,56.95 | 26.25,56.95 31.04,56.95 | 31.04,56.95 R4.2 | 26.25,45.89 26.25,56.95 | R1.1 37.11,61.01 36.1,60 36.1,57.75 35.3,56.95 31.04,56.95 | R10.2 111.45,36.35 | 111.45,36.35 118.35,36.35 v118.35,37.65 | R12.2 101.05,35.85 101.55,36.35 111.45,36.35 | 70.85,13.75 70.85,15.65 71.65,16.45 98.05,16.45 99.35,17.75 99.35,28.12 99.35,29.65 | 99.35,29.65 99.35,33.9 99.85,34.4 100.85,34.4 | 58.35,48.17 58.35,52.22 67.09,52.22 JP2.4 67.19,53.75 70.15,53.75 | JP1.7 70.15,53.75 | 70.15,53.75 72.56,53.75 72.56,53.35 | 72.56,53.35 R8.1 74.02,51.68 74.55,51.15 74.55,45.75 74.25,45.45 R9.2 | R2.1 51.61,61.03 50.27,59.69 50.27,59.65 47.47,59.65 47.47,59.29 | 47.47,59.29 47.47,53.11 48.33,52.25 58.35,52.25 | U2.13 85.6,52.4 86.05,51.95 94.85,51.95 95.45,52.55 95.45,55.25 95.95,55.75 97.25,55.75 97.75,56.25 R7.1 98.4,57.05 112.7,57.05 | 28.65,33.45 28.65,34.45 27.85,35.25 19.41,35.25
  Top 0.2: 47.45,61.01 47.45,59.31 47.47,59.29 | 94.19,29.65 99.35,29.65 | 47.86,15.83 49.35,15.83 | R18.1 47.86,15.83
  Top 0.305: 85.59,54.76 U2.13 | U5.2 49.15,13.75 U5.4 49.15,15.83 49.35,15.83 C11.1 | R23.1 70.85,7.75 | R19.1 31.62,11.6 | 112.7,50.15 G1.P6 | 118.85,31.45 C10.1 | 118.35,36.35 118.4,36.35 | 100.85,34.4 R12.2 | 58.35,52.25 58.35,52.22 | 58.35,48.17 U3.8 | R9.2 | R2.1 56.98,61.03 R3.2 | R11.1 28.65,33.45 | R1.1 47.45,61.01 | R14.1 94.19,29.65 | 83.52,57.93 C2.1 83.52,60.05 70.15,60.05 JP1.7 | C7.1
  Bottom 0.2: G1.P6 117.39,50.11 118.35,49.15 v118.35,37.65
A0  (via drill 0.35)
  Top 0.2: v32.25,36.25 22.65,36.25 21.91,36.99 VR1.A2 | v34.65,36.25 34.65,36.94 35.05,37.34 41.55,37.34 42.03,36.85 42.03,36.33 IC1.3
  Bottom 0.2: v34.65,36.25 v32.25,36.25
A1  (via drill 0.35)
  Top 0.2: v90.35,34.65 90.67,34.97 97.07,34.97 97.85,35.75 97.85,36.75 98.55,37.45 103.95,37.45 104.55,38.05 104.55,39.36 G1.P2 | IC1.7 52.15,34.33
  Top 0.305: 52.15,34.33 v52.15,35.15
  Bottom 0.2: v90.35,34.65 89.15,34.65 86.55,37.25 52.95,37.25 52.15,36.45 v52.15,35.15
A2  (via drill 0.35)
  Top 0.2: G1.P5 97.81,47.61 96.85,46.65 96.85,36.75 96.05,35.95 v91.35,35.95 | IC1.8 50.45,33.83
  Top 0.305: 50.45,33.83 v50.45,34.05
  Bottom 0.2: v50.45,34.05 50.45,37.15 51.15,37.85 87.55,37.85 89.55,35.85 91.35,35.85 v91.35,35.95
A3
  Top 0.2: IC1.9 34.47,33.33 33.65,34.15 33.65,46.85 32.95,47.55 31.54,47.55 VR1.B2
A4
  Top 0.2: 15.15,29.8 12.25,29.8 | 15.15,29.8 S1.2 | 15.15,33.05 15.15,29.8 | 36.25,22.75 34.85,21.35 9.65,21.35 8.65,22.35 8.65,28.95 9.5,29.8 S1.1 | 36.25,25.85 43.32,32.92 58.92,32.92 IC1.10
  Top 0.305: 12.25,29.8 S1.1 | R13.2 15.15,33.05 | 36.25,22.75 36.25,25.85
BOOT
  Top 0.2: SW2.2 103.17,32.3 R12.1 | U4.8 108.35,29.65 107.95,30.05 103.65,30.05 103.15,30.55 103.15,31.27
  Top 0.305: 103.17,32.3 SW2.1 103.15,31.27
D0  (via drill 0.35)
  Top 0.2: v60.95,27.05 61.61,27.05 62.01,27.45 IC1.16 | v24.25,59.05 24.25,58.95 R5.2 19,65.65 17.94,66.71 SW5.1
  Top 0.305: v49.15,34.95 v46.75,34.95
  Bottom 0.2: v60.95,27.05 61.55,27.05 61.95,27.45 61.95,31.25 61.25,31.95 54.12,31.95 53.45,32.62 53.45,32.85 53.05,33.25 49.75,33.25 49.15,33.85 v49.15,34.95 | v46.75,34.95 37.35,34.95 36.45,35.85 36.45,41.25 35.45,42.25 25.95,42.25 24.25,43.95 v24.25,59.05
D1  (via drill 0.35)
  Top 0.2: IC1.15 61.51,28.05 v60.44,28.05 59.65,28.05 59.35,27.75 59.35,27.25 58.95,26.85 57.25,26.85 57.06,26.66 57.06,24.84 v57.45,24.45 | v96.55,53.65 96.55,50.05 96.15,49.65 95.85,49.65 95.55,49.35 95.55,37.45 95.05,36.95 90.65,36.95 v90.35,36.65 | R7.2 v95.75,59.6
  Bottom 0.2: v90.35,36.65 88.55,38.45 49.05,38.45 48.05,37.45 48.05,25.25 49.48,23.82 56.81,23.82 v57.45,24.45 | v96.55,53.65 96.05,53.65 95.75,53.95 v95.75,59.6 95.75,66.17 95.17,66.75 93.45,66.75
  Bottom 0.305: 93.45,66.75 SW8.1
D2  (via drill 0.35)
  Top 0.2: SW6.1 31.39,66.71 32.94,65.16 R4.1 | IC1.23 65.51,26.85 v65.65,26.85 | v59.95,25.25 58.05,25.25 v58.05,26.05 | v52.43,24.88 49.98,24.88 49.95,24.85 40.75,24.85 v40.75,25.25 | v40.85,34.05 40.85,35.75 | v34.65,58.85 32.94,58.85
  Top 0.305: 40.85,35.75 v40.75,35.75 | 32.94,58.85 R4.1
  Bottom 0.2: v65.65,26.85 63.15,26.85 62.65,26.35 62.65,25.75 62.15,25.25 v59.95,25.25 | v58.05,26.05 58.05,25.45 52.43,25.45 v52.43,24.88 | v40.75,25.25 40.75,34.05 v40.85,34.05 | v40.75,35.75 40.75,57.75 39.65,58.85 v34.65,58.85
D5  (via drill 0.35)
  Top 0.2: R6.2 109.7,61.35 | 109.7,61.35 109.7,65.79 108.78,66.71 SW9.1 | IC1.24 66.01,28.15 v70.35,28.15 | 109.7,61.35 115.15,61.35 116.35,60.15 116.35,37.75 115.45,36.85 99.45,36.85 98.59,35.99 98.59,33.04 97.9,32.35 90.75,32.35 90.65,32.25 v90.55,32.35
  Bottom 0.2: v70.35,28.15 70.35,32.75 90.15,32.75 v90.55,32.35
D6  (via drill 0.35)
  Top 0.2: IC1.29 72.34,33.83 72.76,33.41 v72.76,31.95 v72.75,31.95 | v78.15,18.75 90.15,18.75 91.25,19.85 91.25,24.42 92.08,25.25 94.16,25.25
  Top 0.305: 94.16,25.25 R16.1 94.19,25.22 R14.2
  Bottom 0.2: v78.15,18.75 78.15,16.95 77.65,16.45 76.45,16.45 75.95,16.95 75.95,24.55 75.45,25.05 73.55,25.05 72.44,26.16 72.44,30.85 72.75,31.15 v72.75,31.95
D7  (via drill 0.35)
  Top 0.2: SW7.1 49.55,66.71 49.55,62.39 | 49.55,62.39 49.55,61.01 | IC1.30 73.15,34.33 73.45,34.03 73.45,33.01 77.72,33.01 78.49,32.24 v78.49,31.99 | v97.35,62.05 96.65,62.05 93.77,64.93 90.33,67.22 58.49,67.22 57.8,66.52 57.8,64.15 56.04,62.39 49.55,62.39
  Top 0.305: 49.55,61.01 R1.2
  Bottom 0.2: v78.49,31.99 78.92,31.99 78.94,31.97 88.86,31.97 92.15,28.67 92.15,7.45 93.25,6.35 103.75,6.35 104.05,6.65 104.05,7.65 104.65,8.25 114.05,8.25 114.85,9.05 114.85,42.05 113.55,43.35 103.15,43.35 102.35,44.15 102.35,61.45 101.75,62.05 v97.35,62.05
D9  (via drill 0.35)
  Top 0.2: S3.1 S3.2 28.76,11.45 | v57.45,30.95 57.45,31.49 57.79,31.83 IC1.12 | v55.53,31.02 55.53,28.22 53.88,26.1 38.5,26.1 38.25,25.85 38.25,21.45 36.95,20.15 30.15,20.15 28.76,18.76 R19.2
  Top 0.305: 28.76,11.45 R19.2
  Bottom 0.2: v57.45,30.95 57.38,31.02 v55.53,31.02
D10  (via drill 0.35)
  Top 0.2: SW10.1 72,1.9 71.55,2.35 71.55,5.65 71.95,6.05 72.55,6.05 72.95,6.45 72.95,7.75 | v71.25,30.95 71.25,31.55 69.97,32.83 IC1.27 | R23.2 75.35,7.75 v75.35,7.55
  Top 0.305: 72.95,7.75 R23.2
  Bottom 0.2: v75.35,7.55 75.35,23.55 74.82,24.08 71.95,24.08 71.25,24.78 v71.25,30.95
D11  (via drill 0.35)
  Top 0.2: 68.07,31.83 68.85,31.05 v68.85,28.95 | 76.09,20.91 Q1.1 | 73.85,20.91 v73.85,22.05
  Top 0.305: IC1.25 68.07,31.83 | R17.1 76.09,20.91 | Q1.1 73.85,20.91
  Bottom 0.2: v68.85,28.95 68.85,23.62 69.65,22.82 73.45,22.82 73.85,22.42 v73.85,22.05
D12  (via drill 0.35)
  Top 0.2: 27.25,29.8 S2.1 | 27.25,29.8 S2.2 | 27.25,29.8 27.25,33.45 | IC1.28 71.57,33.33 72.05,32.85 72.05,27.45 72.92,26.58 76.81,26.58 | v76.75,18.05 76.75,17.75 76.35,17.35 70.85,17.35 69.95,16.45 69.95,15.25 69.35,14.65 58.55,14.65 56.85,16.35 56.85,20.35 56.15,21.05 v40.95,21.05 | v33.65,29.75 31.82,29.75
  Top 0.305: 27.25,33.45 R11.2 | 31.82,29.75 S2.2 | v76.82,26.56 76.81,26.58
  Bottom 0.2: v76.82,26.56 76.82,18.12 v76.75,18.05 | v40.95,21.05 34.75,21.05 33.65,22.15 v33.65,29.75
D13  (via drill 0.35)
  Top 0.2: R21.1 93.51,10.15 81.95,10.15 81.35,10.75 v81.35,11.65 | IC1.26 68.87,32.33 69.77,31.44 69.77,29.73 70.34,29.16 71.25,29.16 71.25,26.9 72.25,25.91 78.88,25.91 79.68,26.71 v79.68,27.52
  Bottom 0.2: v81.35,11.65 81.35,27.15 80.95,27.55 79.68,27.55 v79.68,27.52
D+  (via drill 0.35)
  Top 0.2: IC1.34 79.17,36.33 80.06,35.44 v80.06,29.06 v80.05,29.05 | J2.3 81.31,7.45 v81.95,7.45
  Bottom 0.2: v81.95,7.45 81.95,9.15 81.45,9.65 80.55,9.65 80.05,10.15 80.05,25.35 79.75,25.65 79.05,25.65 78.55,26.15 78.55,27.55 v80.05,29.05
D+_ESP
  Top 0.2: J1.3 111.75,8.15 112.85,9.25 U4.14
D-  (via drill 0.35)
  Top 0.2: IC1.33 78.07,35.83 79.31,34.59 v79.31,30.96 | J2.2 80.66,8.25 v80.75,8.25
  Bottom 0.2: v80.75,8.25 79.85,8.25 79.25,8.85 79.25,24.35 78.85,24.75 78.18,24.75 77.98,24.95 77.98,27.66 79.31,29 v79.31,30.96
D-_ESP
  Top 0.2: J1.2 111.1,11.3
  Top 0.305: 111.1,11.3 U4.13
DIO0  (via drill 0.35)
  Top 0.152: v65.75,25.75 65.75,25.62 65.65,25.52
  Top 0.2: U2.14 83.6,52.15 82.9,51.45 79.35,51.45 78.21,50.31 78.21,37.94 79.3,36.85 80.25,36.85 80.75,36.35 80.75,26.65 79.58,25.49 65.65,25.52 | IC1.14 61.01,29.14 v59.95,28.85
  Bottom 0.2: v65.75,25.75 65.75,24.25 65.05,23.55 59.65,23.55 58.75,24.45 58.75,28.35 59.25,28.85 v59.95,28.85
GND  (via drill 0.35)  (5 unrouted)
  Top 0.2: IC1.35 63.01,36.83 IC1.18
  Top 0.305: J2.6 78.58,2.41 J2.SH3 78.58,5.69 J2.SH1 | J2.7 84.03,2.41 J2.SH4 | J2.5 83.73,5.48 J2.SH2 | J1.6 109.02,2.43 J1.SH3 109.02,5.71 J1.SH1 | J1.7 114.48,2.43 J1.SH4 114.48,5.51 114.17,5.51 | J1.5 114.17,5.51 | 114.17,5.51 J1.SH2
  other vias: 106.05,6.25 94.15,19.25 59.15,9.15 10.85,14.95 7.15,59.05 44.75,55.95 68.65,63.95 69.65,63.95 70.65,63.95 71.65,63.95 72.65,63.95 73.65,63.95 74.65,63.95 75.65,63.95 76.65,63.95 77.65,63.95 78.65,63.95 79.65,63.95 80.65,63.95 81.65,63.95 82.65,63.95 83.65,63.95 84.65,63.95 85.65,63.95 86.65,63.95 87.65,63.95 68.95,61.55 69.95,61.55 70.95,61.55 71.95,61.55 72.95,61.55 73.95,61.55 74.95,61.55 75.95,61.55 76.95,61.55 77.95,61.55 78.95,61.55 79.95,61.55 80.95,61.55 81.95,61.55 82.95,61.55 83.95,61.55 84.95,61.55 85.95,61.55 86.95,61.55 87.85,60.85 88.65,60.15 89.25,59.35 90.15,58.65 90.95,57.95 91.75,57.25 94.85,56.85 94.15,57.65 93.55,58.35 92.85,59.05 92.15,59.75 91.45,60.45 90.75,61.15 90.05,61.85 89.35,62.55 88.65,63.35
  pour Top: -8.47,-14.57 133.27,-14.57 133.27,80.37 -8.47,80.37
  pour Bottom: -7.97,-16.17 133.17,-16.17 133.17,81.07 -8.34,81.07 -7.98,80.18 -7.97,80.17 -7.97,80.16 -7.97,80.16 -7.97,80.15
LORA_ANT
  Top 0.508: U1.1 87.66,62.64 93.6,56.7 U2.9
LORA_RESET  (via drill 0.35)
  Top 0.2: v55.85,26.76 55.87,26.76 55.87,23.38 56.47,22.79 87.48,22.79 89.6,24.9 U2.6 | 60.51,29.89 57.99,29.89 57.51,29.41 57.51,27.89 v57.55,27.85
  Top 0.305: 60.51,29.89 IC1.13
  Bottom 0.2: v57.55,27.85 56.46,26.76 v55.85,26.76
MISO
  Top 0.2: U2.2 81.6,26.02 80.65,25.07 65.13,25.07 64.51,25.69 IC1.21
MOSI  (via drill 0.35)
  Top 0.2: v83.55,27.15 83.55,39.36 | v83.55,23.93 83.53,23.95 64.55,23.95 63.51,24.99 IC1.19
  Top 0.305: 83.55,39.36 U2.3
  Bottom 0.2: v83.55,23.93 v83.55,27.15
N$2
  Top 0.2: IC1.43 63.01,43.61 63.27,43.87 C4.1
N$4  (via drill 0.35)
  Top 0.2: R18.2 53.35,19.36 v53.35,19.35 | v59.35,21.65 59.35,18.78 LS1.1
  Bottom 0.2: v53.35,19.35 53.35,20.86 54.14,21.65 v59.35,21.65
N$5
  Top 0.2: R24.1 60.78,7.78 61.65,8.65 U6.1
N$6
  Top 0.2: 72.91,18.78 LS1.2
  Top 0.305: Q1.3 72.91,18.78
N$7
  Top 0.2: LED2.C 60.78,3.4
  Top 0.305: 60.78,3.4 R24.2
N$8
  Top 0.305: LED3.A 94.2,7.55 R21.2
N$10
  Top 0.2: R20.1 U6.5
  Top 0.305: U6.5
N$12
  Top 0.2: IC1.2 55.18,36.83
  Top 0.305: 55.18,36.83 55.18,38.92 | 55.18,38.92 XTAL1.1 | C6.1 55.18,38.92
N$15
  Top 0.305: IC1.1 57.68,37.33 XTAL1.2 57.68,40.98 57.27,41.39 C5.1
N$16
  Top 0.152: 51.26,9.76 51.38,9.88 U5.3
  Top 0.2: 51.41,9.59 C13.1
  Top 0.305: 51.41,9.59 51.41,9.95 U5.3 | SW11.3 51.26,8.24 51.44,8.42 51.44,9.82 51.38,9.88
N$17
  Top 0.152: U4.7 109.85,26.9 109.19,26.24 R15.1
N$30
  Top 0.2: R22.2 32.27,5.5
  Top 0.305: 32.27,5.5 LED1.A
NSS
  Top 0.2: 59.01,32.35 57.04,32.35 56.6,31.91 56.6,24.33 57.69,23.24 84.28,23.24 87.6,26.56 U2.5
  Top 0.305: 59.01,32.35 IC1.11
RESET
  Top 0.2: SW1.1 70.48,42.59 70.26,42.36 65.26,42.36 64.51,41.61 IC1.40 | R9.1 70.48,45.44 SW1.1 | SW1.2 SW1.1
RESET_ESP
  Top 0.2: 117.35,29.65 116.95,30.05 113.95,30.05 113.35,30.65 113.35,31.23 | 113.35,31.23 113.35,32.9 | 113.35,31.23 SW3.2 SW3.1
  Top 0.305: U4.2 117.35,29.65 | 113.35,32.9 C8.1 113.4,32.85 R10.1
RXD  (via drill 0.35)
  Top 0.2: IC1.38 65.51,40.09 65.85,40.44 67.67,40.44 68.45,39.65 75.3,39.65 75.77,40.12 75.77,46.73 75.85,46.73 v75.85,51.55 | v109.85,9.35 U4.12
  Bottom 0.2: v75.85,51.55 96.92,51.55 97.62,50.85 97.62,19.17 98.55,18.24 108.86,18.24 109.85,17.25 v109.85,9.35
SCK
  Top 0.2: IC1.20 64.01,25.29 64.69,24.61 84.15,24.61 85.6,26.06 U2.4
SCL  (via drill 0.35)
  Top 0.2: IC1.32 74.34,35.33 74.85,34.82 74.85,34.35 v75.45,34.35 | v60.35,45.05 59.75,45.65 58.3,45.65 | JP1.2 57.45,59.1
  Top 0.305: 58.3,45.65 U3.6 | 57.45,59.1 R3.1
  Bottom 0.2: v75.45,34.35 76.45,33.35 94.21,33.35 94.81,33.95 94.81,43.19 92.95,45.05 v60.35,45.05 57.85,45.05 57.45,45.45 JP1.2
SDA  (via drill 0.35)
  Top 0.2: IC1.31 73.66,34.83 74.15,34.34 74.15,33.51 77.05,33.51 v77.05,34.05 | U3.5 60.15,44.36 v60.15,42.95 | JP1.1 54.91,59.13
  Top 0.305: 54.91,59.13 R2.2
  Bottom 0.2: JP1.1 54.91,43.59 55.55,42.95 v60.15,42.95 91.05,42.95 92.55,41.45 92.55,34.35 92.06,33.87 77.23,33.87 v77.05,34.05
SWCLK
  Top 0.2: 72.56,49.58 JP2.1 70.05,49.58 70.05,47.85 69.45,47.25 62.75,47.25 62.01,46.51 IC1.45
  Top 0.305: 72.56,49.58 R8.2
SWDIO
  Top 0.2: JP2.2 62.48,49.58 61.51,48.61 IC1.46
TXD  (via drill 0.35)
  Top 0.2: v76.55,45.95 76.55,39.45 75.93,38.83 IC1.37 | U4.11 v108.35,9.35
  Bottom 0.2: v76.55,45.95 94.25,45.95 95.95,44.25 95.95,18.45 97.15,17.25 107.45,17.25 108.35,16.35 v108.35,9.35 108.15,9.55
VBAT  (via drill 0.35)
  Top 0.2: 76.3,12.73 C12.1 | 76.3,12.73 76.3,11.33 D1.A 74.53,11.33 74.25,11.05 v74.25,9.75 | 67.37,8.44 v68.67,8.44 | J3.1 97.15,12.73 76.3,12.73
  Top 0.305: 67.37,8.44 U6.3
  Bottom 0.2: v74.25,9.75 69.05,9.75 68.67,9.37 v68.67,8.44
VBUS  (via drill 0.35)
  Top 0.2: U6.4 v69.35,11.25 69.54,11.06 69.54,7.74 68.55,6.75 63.55,6.75 62.95,6.15 LED2.A 64.2,5.5 64.65,5.05 64.65,2.05 64.25,1.64 58.06,1.64 57.45,2.25 57.45,6.35 56.55,7.25 53.45,7.25 v53.45,7.15 | J2.1 80.01,9.15 80.01,11.33 D1.C | 79.15,11.33 79.15,9.55 78.55,8.95 72.75,8.95 72.05,9.65 v72.05,11.25 | J1.1 110.45,6.85 109.75,7.55 99.45,7.55 98.65,6.75 98.65,2.55 97.85,1.75 89.15,1.75 88.25,2.65 88.25,8.15 87.35,9.05 80.01,9.05
  Top 0.305: D1.C 79.15,11.33 | 80.01,9.05 80.01,9.15 | v69.35,11.25
  Bottom 0.2: v69.35,11.25 v72.05,11.25
  Bottom 0.305: v53.45,7.15 49.25,7.15 48.26,6.16 SW11.2

## Text on the board
tNames: Aux2 | ED-TRIM | AR-TRIM | EU-TRIM | AL-TRIM | FRAM | 1 | Aileron/Elevator / Gimbal | Throttle/Rudder / Gimbal | Boot | Reset | 1 | RR-Trim | RL-Trim | 1 | LoRa RC Transmitter V 4.0 | - | Mike Walach 2026 | + | + | - | Do Not Power On Without Antenna Installed! | + | USB-M0 | USB-ESP32 | + | AUX1 | + | BIND | - | Off | - | Power LED | - | On